# Altium PCB EN2091_Analog_Project_PCB.PcbDoc (part 2 of 2)
Units mm, origin at the board's own origin, x right, y up, seen from the top; angles counter-clockwise.
Board outline 100.01 x 60.01 mm, 2 copper layers (Top Layer, Bottom Layer); 44 components, 26 nets, 123 pads, 280 vias.
Unrouted connection lines stored in the file: 15.
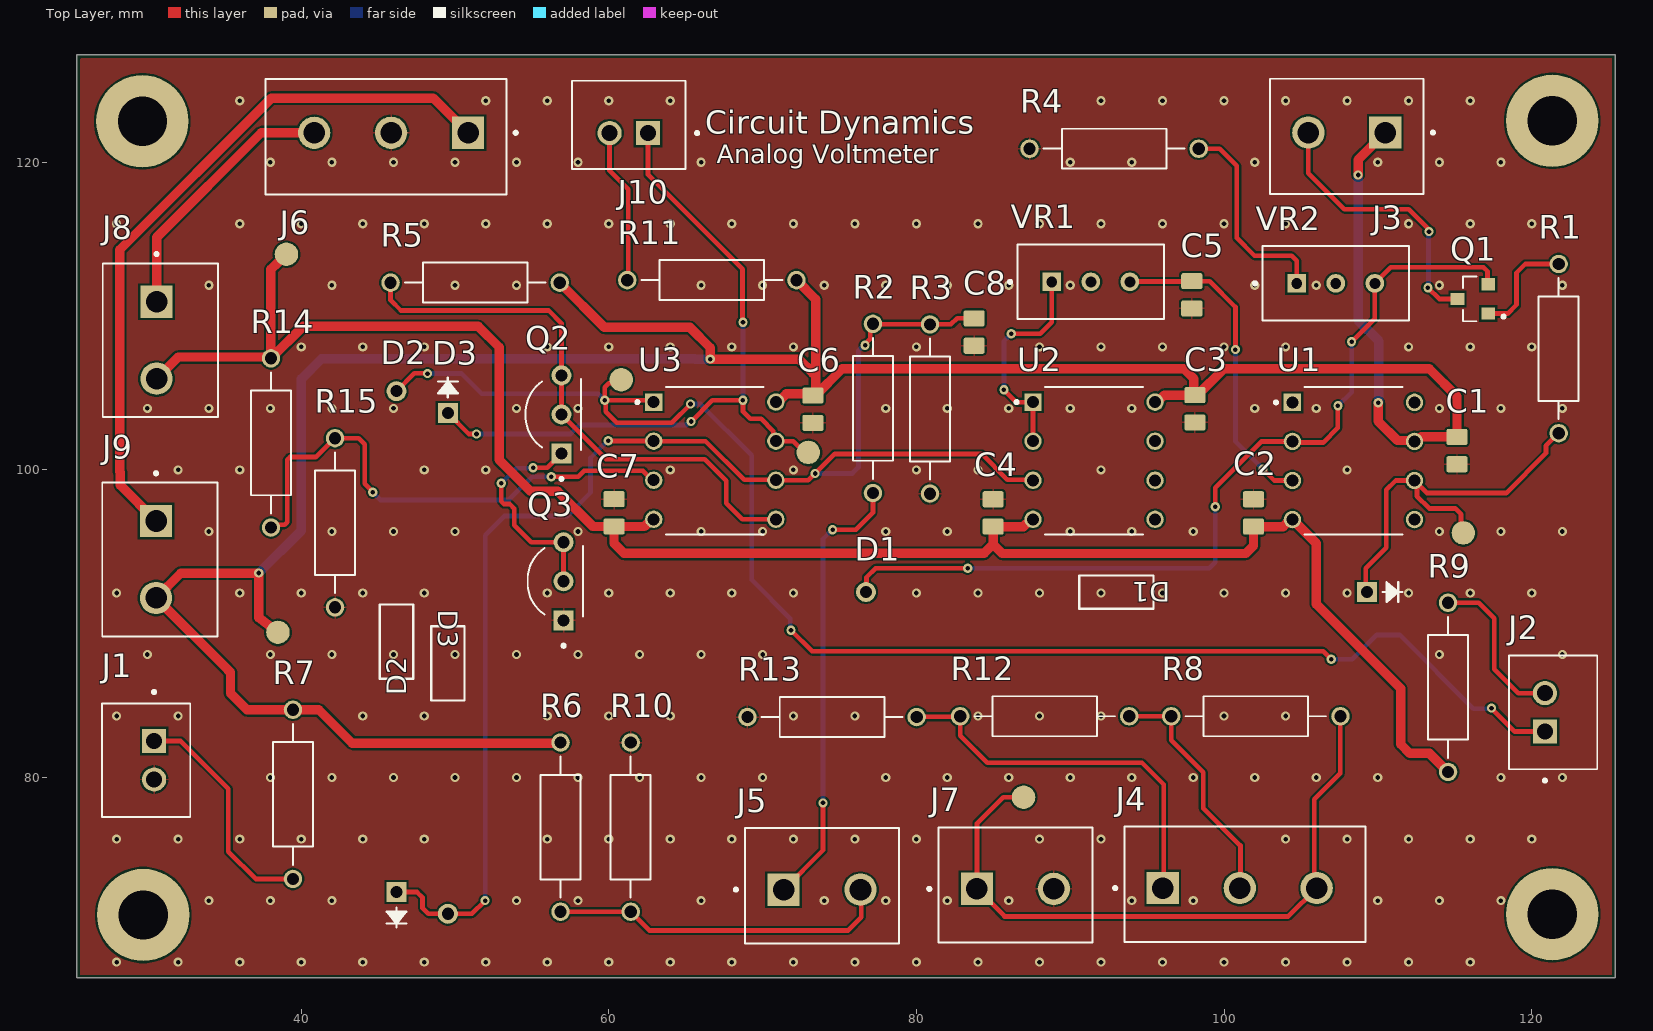
[diagram p0: Top Layer view]

## Via types
v1: diameter 0.6, hole 0.3, Top Layer to Bottom Layer, 280 vias

## Nets (pads, with @x,y where several pads share a name; then routed paths per layer and width w, separated by ;. In a path a pad name is that pad's centre, name@x,y a point inside that pad or via, vN(x,y) a via of type N, cw(c..) or ccw(c..) an arc to the next point about the centre after c; other vN are vias at no path point) (continued)
GND: (continued)
  other v1: 28,68 32,68 36,68 40,68 44,68 48,68 52,68 56,68 60,68 64,68 68,68 72,68 76,68 80,68 84,68 88,68 92,68 96,68 100,68 104,68 108,68 112,68 116,68 34,72 38,72 42,72 54,72 58,72 66,72 74,72 78,72 82,72 86,72 94,72 98,72 110,72 114,72 118,72 28,76 32,76 36,76 40,76 44,76 48,76 56,76 60,76 64,76 68,76 72,76 76,76 80,76 88,76 92,76 104,76 108,76 112,76 116,76 120,76 38,80 42,80 46,80 50,80 54,80 58,80 62,80 66,80 70,80 78,80 82,80 86,80 90,80 94,80 98,80 102,80 106,80 110,80 118,80 122,80 28,84 32,84 44,84 48,84 56,84 60,84 64,84 72,84 76,84 84,84 88,84 92,84 100,84 104,84 30,88 38,88 42,88 46,88 50,88 54,88 58,88 62,88 66,88 70,88 114,88 122,88 28,92 36,92 40,92 44,92 48,92 56,92 60,92 64,92 68,92 72,92 80,92 84,92 88,92 92,92 96,92 100,92 104,92 108,92 112,92 116,92 120,92 34,96 42,96 46,96 50,96 58,96 66,96 70,96 78,96 82,96 90,96 94,96 98,96 114,96 118,96 122,96 32,100 36,100 48,100 52,100 64,100 72,100 80,100 84,100 92,100 108,100 30,104 34,104 38,104 42,104 46,104 54,104 58,104 78,104 82,104 86,104 90,104 94,104 102,104 106,104 114,104 118,104 122,104 40,108 44,108 48,108 56,108 60,108 64,108 68,108 72,108 80,108 88,108 92,108 96,108 100,108 104,108 112,108 116,108 120,108 34,112 42,112 50,112 54,112 66,112 70,112 74,112 78,112 82,112 86,112 90,112 102,112 106,112 114,112 122,112 28,116 36,116 40,116 44,116 48,116 52,116 56,116 60,116 64,116 68,116 72,116 76,116 80,116 84,116 88,116 92,116 96,116 100,116 104,116 112,116 116,116 120,116 38,120 42,120 46,120 50,120 54,120 58,120 66,120 90,120 94,120 102,120 110,120 114,120 118,120 36,124 52,124 56,124 60,124 64,124 92,124 96,124 100,124 104,124 108,124 112,124 116,124
LED_1: D2.2 J2.1 pad.10 U3.1 | length 98.1
  Top Layer w0.305: D2.2 47.356,106.282 48.089,106.282 48.107,106.263 v1(48.216,106.263) ; pad.10 60.569,105.633 59.996,105.633 59.744,105.38 v1(59.744,104.531) ; U3.1 62.799,104.531 v1(59.744,104.531) ; v1(65.312,104.283) 64.096,103.067 60.504,103.067 59.797,103.773 59.797,104.477 v1(59.744,104.531) ; v1(71.847,89.58) 73.215,88.212 106.445,88.212 v1(106.973,87.684) ; v1(117.387,84.513) 118.911,82.989 J2.1
  Bottom Layer w0.305: v1(48.216,106.263) 50.442,106.263 51.755,104.95 59.324,104.95 v1(59.744,104.531) ; v1(65.312,104.283) 65.958,104.283 69.295,100.946 69.295,92.848 71.806,90.337 71.806,89.62 v1(71.847,89.58) ; v1(106.973,87.684) 108.341,87.684 109.926,89.269 111.419,89.269 116.206,84.482 117.356,84.482 v1(117.387,84.513)
LED_2: D3.1 J10.1 pad.11 U3.7 | length 47
  Top Layer w0.305: D3.1 50.907,102.335 v1(51.396,102.335) ; J10.1 62.551,119.193 68.698,113.046 68.698,109.672 68.724,109.646 v1(68.724,109.594) ; v1(65.35,103.145) 66.738,104.532 v1(68.719,104.532) 68.719,103.8 69.195,103.324 69.905,103.324 70.702,102.527 70.702,102.027 U3.7 71.98,101.87 72.712,101.138 pad.11
  Bottom Layer w0.305: v1(51.396,102.335) 57.184,102.335 57.186,102.337 57.516,102.337 58.101,102.922 65.048,102.922 65.271,103.145 v1(65.35,103.145) ; v1(68.719,104.532) 68.724,104.536 v1(68.724,109.594)
NetC5_2: C5.2 U1.3 VR1.3 | length 21.1
  Top Layer w0.305: VR1.3 93.9,112.251 97.881,112.251 C5.2 99.061,112.273 100.741,110.593 v1(100.741,107.823) ; v1(102.53,100.053) 103.272,99.312 U1.3
  Bottom Layer w0.305: v1(100.741,107.823) 100.741,101.867 102.53,100.078 v1(102.53,100.053)
NetD1_1: D1.1 pad.8 R1.1 U1.6 | length 26.6
  Top Layer w0.305: D1.1 109.204,92.136 109.204,93.601 110.554,94.951 110.554,98.712 111.154,99.312 U1.6 ; pad.8 115.407,96.058 115.407,97.124 115.038,97.493 113.345,97.493 112.541,98.297 112.541,99.154 U1.6 ; R1.1 120.93,101.561 120.93,101.076 118.35,98.497 113.198,98.497 U1.6
NetD1_2: D1.2 Q1.2 U1.2 VR2.3 | length 57.7
  Top Layer w0.305: D1.2 76.755,92.094 76.755,93.018 77.345,93.608 v1(83.331,93.608) ; v1(99.423,97.612) 99.423,98.836 102.438,101.852 U1.2 104.516,101.779 106.453,101.779 107.401,102.727 v1(107.401,104.17) ; v1(108.294,108.334) 108.322,108.361 108.346,108.361 109.804,109.82 VR2.3 110.841,113.167 116.867,113.167 117.133,112.901 117.133,112.106 Q1.2
  Bottom Layer w0.305: v1(83.331,93.608) 99.042,93.608 99.423,93.988 v1(99.423,97.612) ; v1(107.401,104.17) 108.294,105.063 v1(108.294,108.334)
NetJ1_1: J1.1 R7.2 | length 15.1
  Top Layer w0.305: J1.1 32.171,82.373 35.267,79.276 35.267,75.184 37.045,73.407 R7.2
NetJ2_2: J2.2 R9.2 | length 10.7
  Top Layer w0.305: R9.2 116.552,91.364 117.559,90.357 117.559,87.055 119.126,85.489 J2.2
NetJ4_1: J4.1 R12.1 R13.2 | length 25.4
  Top Layer w0.305: R13.2 80.039,83.96 82.815,83.96 R12.1 82.84,82.716 84.602,80.954 94.666,80.954 96.071,79.549 96.071,72.863 J4.1
NetJ4_2: J4.2 R8.1 R12.2 | length 15.8
  Top Layer w0.305: R12.2 R8.1 96.565,82.434 98.653,80.346 98.653,77.992 101.067,75.577 101.067,72.859 J4.2
NetJ4_3: J4.3 J7.1 pad.7 R8.2 | length 43.5
  Top Layer w0.305: pad.7 85.647,78.718 83.936,77.007 J7.1 85.729,70.971 104.179,70.971 J4.3 105.872,72.964 105.872,78.575 107.565,80.268 R8.2
NetJ6_1: J6.1 J9.1 | length 46.3
  Top Layer w0.61: J9.1 28.245,99 28.245,99.841 28.198,99.888 28.198,114.312 38.062,124.175 48.592,124.175 J6.1
NetJ6_3: J6.3 J8.1 | length 17.2
  Top Layer w0.61: J8.1 30.599,115.117 37.402,121.92 J6.3
NetJ10_2: J10.2 R11.2 | length 10.1
  Top Layer w0.305: J10.2 60.051,119.465 61.261,118.255 61.261,112.399 R11.2
NetQ1_1: Q1.1 R1.2 | length 7.1
  Top Layer w0.305: Q1.1 118.451,110.165 119.014,110.728 119.014,112.813 119.589,113.388 R1.2
NetQ2_1: Q2.1 Q3.2 Q3.3 | length 14.2
  Top Layer w0.305: v1(53.004,99.134) 53.004,97.964 53.182,97.785 53.556,97.785 53.855,97.486 53.855,96.401 54.957,95.299 Q3.3 Q3.2 ; v1(55.08,100.138) 55.994,100.137 Q2.1
  Bottom Layer w0.305: v1(53.004,99.134) 53.98,100.11 55.052,100.11 v1(55.08,100.138)
NetQ2_2: Q2.2 Q2.3 R5.2 U3.5 | length 36.4
  Top Layer w0.305: R5.2 45.813,111.043 46.491,110.365 56.085,110.365 56.921,109.529 Q2.3 Q2.2 59.823,100.703 66.236,100.703 67.64,99.3 67.64,97.827 68.677,96.79 U3.5
NetR4_2: R4.2 VR2.1 | length 13.6
  Top Layer w0.305: R4.2 99.712,120.882 100.819,119.775 100.819,115.08 101.98,113.92 104.406,113.92 104.724,113.602 VR2.1
NetU2_1: U2.1 U2.2 VR1.1 | length 14.2
  Top Layer w0.305: v1(85.688,105.214) 86.495,104.407 U2.1 U2.2 ; v1(86.169,108.852) 88.045,108.852 88.798,109.605 VR1.1
  Bottom Layer w0.305: v1(85.688,105.214) 85.688,108.371 v1(86.169,108.852)
RES_IN: R14.1 R15.2 U3.3 | length 33.9
  Top Layer w0.305: R14.1 38.208,96.426 38.921,96.426 39.099,96.604 39.099,100.658 39.278,100.836 40.946,100.836 42.172,102.062 R15.2 43.735,102.062 44.128,101.669 44.128,99.101 44.648,98.581 v1(44.648,98.55) ; v1(56.253,99.559) 56.259,99.552 58.006,99.552 58.391,99.937 62.221,99.937 62.828,99.33 U3.3
  Bottom Layer w0.305: v1(44.648,98.55) 45.152,98.046 53.509,98.046 55.022,99.559 v1(56.253,99.559)
V_Clip: C8.2 D2.1 D3.2 R2.2 R3.2 U2.3 U3.2 U3.6 | length 92.3
  Top Layer w0.305: D2.1 47.528,72.558 47.891,72.195 47.891,71.512 48.262,71.142 D3.2 51.103,71.142 v1(51.959,71.998) ; v1(59.968,101.889) 59.978,101.88 62.91,101.88 U3.2 66.288,101.87 68.802,99.355 70.834,99.355 U3.6 72.972,99.33 v1(73.411,99.769) 74.682,101.039 84.234,101.039 85.903,99.37 87.535,99.37 U2.3 ; v1(76.662,108.101) 76.662,108.181 77,108.519 77,109.326 R2.2 77.19,109.479 80.863,109.479 R3.2 82.242,109.461 82.651,109.869 83.735,109.869 C8.2
  Bottom Layer w0.305: v1(51.959,71.998) 51.959,95.746 53.214,97.001 57.288,97.001 58.81,98.523 58.81,100.775 59.925,101.889 v1(59.968,101.889) ; v1(73.411,99.769) 75.84,99.769 76.232,100.161 76.232,107.746 76.587,108.101 v1(76.662,108.101)
pads on no net: U1.1 U1.5 U1.8 U2.5 U2.6 U2.7 VR1.2 VR2.2

## Polygon pours and split planes (outlines as drawn)
GND on Bottom Layer "GND_L02_P001" (solid, remove dead copper, pour order 1): 25.423,126.983 25.425,126.985 125.424,126.985 125.424,66.977 25.419,66.977
GND on Top Layer "GND_L01_P000" (solid, remove dead copper, pour order 0): 25.418,126.983 25.419,126.983 125.425,126.983 125.425,66.977 25.419,66.977

## Silkscreen, mask and mechanical layers (free items; w line width, h text height)
Top Overlay:
  text "Circuit Dynamics" at 66.26,121.868 h1.5
  text "Analog Voltmeter" at 67.021,119.932 h1.2
Mechanical 13:
  the board outline again, w0.254